# Altium PCB WireCuttingSampling.PcbDoc (part 2 of 2)
Units mil, origin at the board's own origin, x right, y up, seen from the top; angles counter-clockwise.
Board outline 4901 x 3424.05 mil, 2 copper layers (Top Layer, Bottom Layer); 137 components, 97 nets, 362 pads, 199 vias.
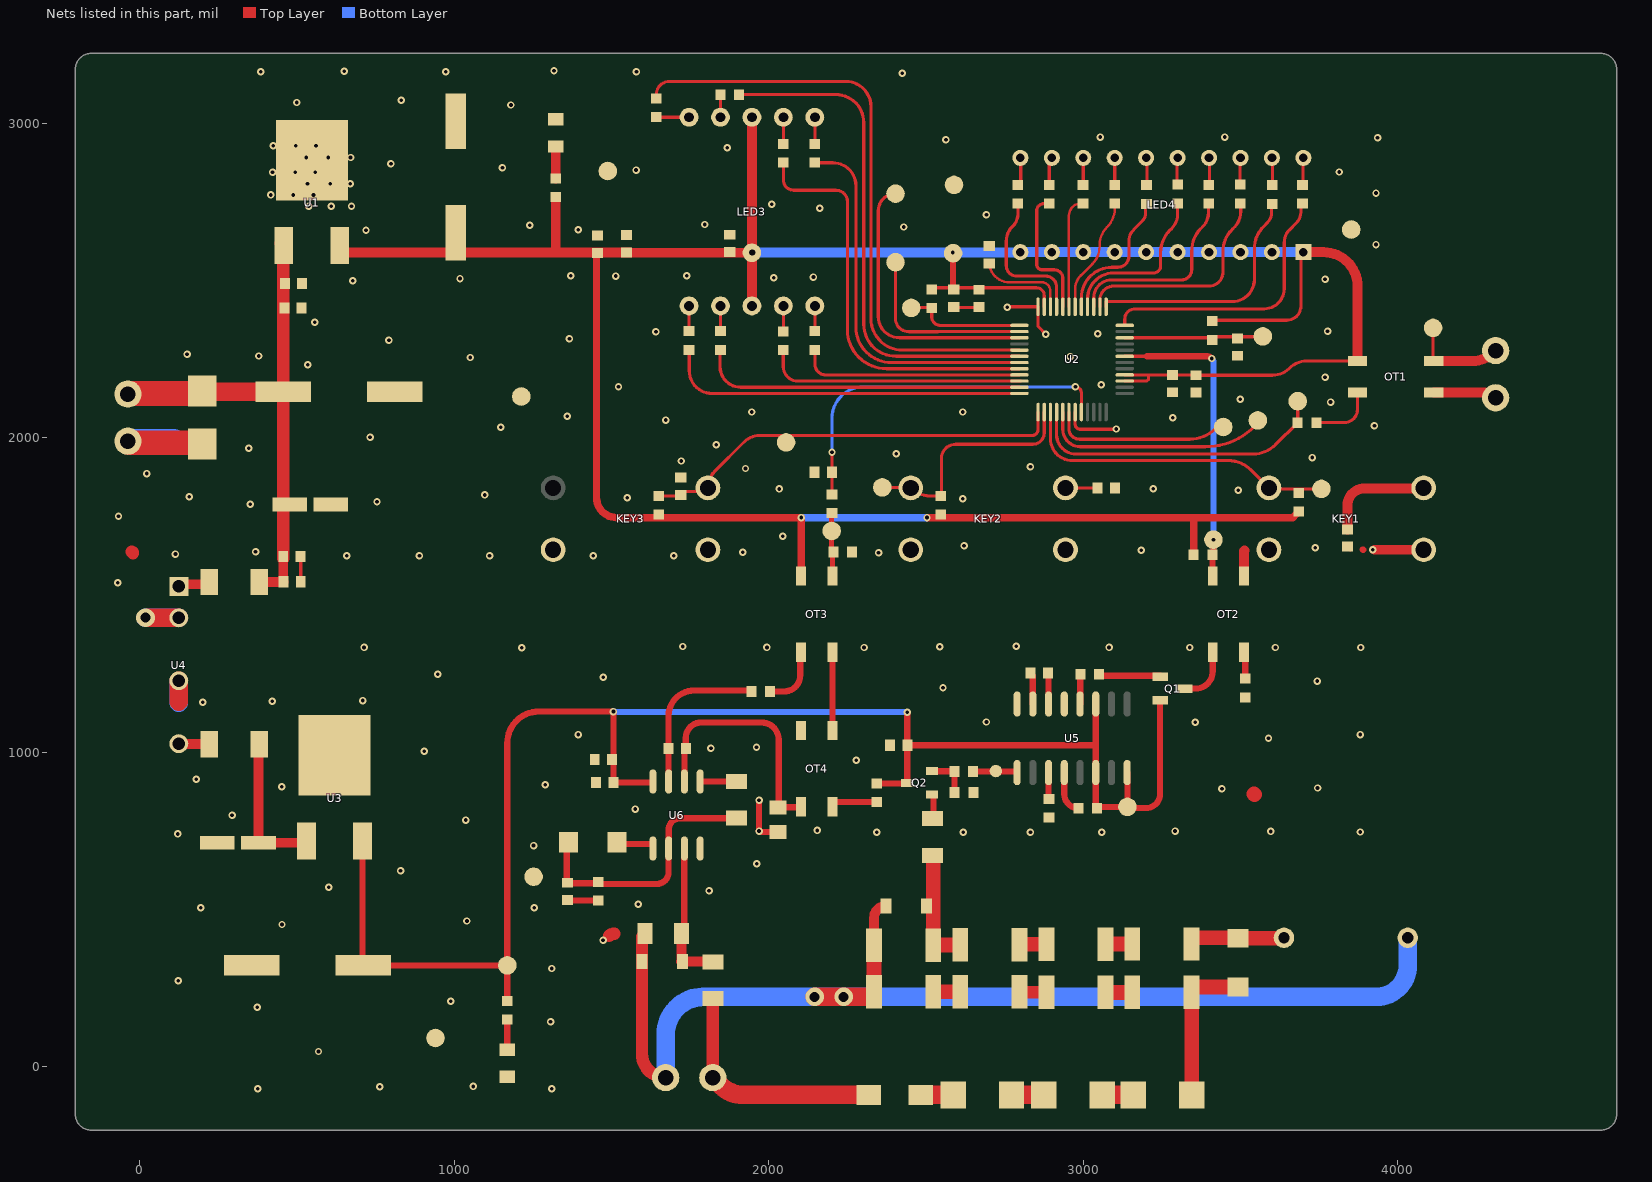
[diagram p2: the nets of this part, all layers, seen from the top]

## Part data (continued)
U5: "接口类型:-;最大输出频率:1.3MHz;输出通道数:2;", JLCPCB Part Class="Extended Part", LCSC Part Name=微功率锁相环, Manufacturer=HGSEMI(华冠), ManufacturerPart=CD4046BM/TR, Operating Temperature=-40℃~+85℃, Output Frequency(Max)=1.3MHz, Voltage - Supply=3V~15V, AddInBom=yes, Clock/Oscillator=外置, ConvertToPcb=yes, Cycle-to-Cycle Jitter=-, Datasheet=https://item.szlcsc.com/datasheet/CD4046BM%252FTR/8436734.html, Features=-, FootprintName=SOP-16_L9.9-W3.9-P1.27-LS6.0-BL, Input=-, Interface=-, ModelId=ed96d47c1e844792b3e705d722a1a1fa, ModelName=SOP-16_L9.9-W3.9-P1.27-LS6.0-BL, ModelTransform=389.763,236.22,0,0,0,0,0,0,0, Number of Outputs=2, Output=-, Period Jitter=-, Phase Jitter=-, Phase Offset=-, Supplier=LCSC, Supplier Footprint=SOP-16, SupplierPart=C7432285, Symbol=CD4046BM/TR
U6: "放大器数:2;轨到轨:-;增益带宽积(GBW):-;输入失调电压(Vos):7mV;压摆率(SR):-;输入偏置电流(Ib):150nA;", Ib - Input Bias Current=150nA, Input offset current drift(Ios TC)=10pA/℃, Input Offset Current(Ios)=5nA, Input Offset Voltage Drift(Vos TC)=10uV/℃, Input Voltage Noise Density=-, JLCPCB Part Class="Basic Part", LCSC Part Name=单电源双运算放大器, Manufacturer=onsemi(安森美), ManufacturerPart=LM358DR2G, Maximum Power Supply Range (Vdd-Vss)=32V, Operating Temperature=0℃~+70℃, Output Current=40mA, Quiescent Current=700uA, Vos - Input Offset Voltage=7mV, AddInBom=yes, Common Mode Rejection Ratio(CMRR)=70dB, ConvertToPcb=yes, Datasheet=https://item.szlcsc.com/datasheet/LM358DR2G/8427.html, Dual Supply=-16V~16V, Features=-, FootprintName=SOIC-8_L5.0-W4.0-P1.27-LS6.0-BL, Gain Bandwidth Product=-, ModelId=7abc64c95a1a4a04a4ef38f9097c870b, ModelName=SOIC-8_L5.0-W4.0-P1.27-LS6.0-BL, ModelTransform=192.913,236.22,0,0,0,0,0,0,0, Number of Channels=2, Rail to Rail=-, Single supply=3V~32V, Slew Rate=-, Supplier=LCSC, Supplier Footprint=SOIC-8, SupplierPart=C7950, Symbol=LM358DR2G

## Via types
v1: diameter 23.62, hole 11.81, Top Layer to Bottom Layer, tented both sides, 191 vias
v2: diameter 314.96, hole 157.48, Top Layer to Bottom Layer, tented both sides, 4 vias
v3: diameter 59.06, hole 31.5, Top Layer to Bottom Layer, tented both sides, 3 vias
v4: diameter 39.37, hole 19.68, Top Layer to Bottom Layer, tented both sides, 1 vias

## Nets (pads, with @x,y where several pads share a name; then routed paths per layer and width w, separated by ;. In a path a pad name is that pad's centre, name@x,y a point inside that pad or via, vN(x,y) a via of type N, cw(c..) or ccw(c..) an arc to the next point about the centre after c; other vN are vias at no path point)
+5V: C6.2 C7.1 C12.2 C13.2 C14.2 C15.2 C16.2 E2.1 LED3.3 LED3.8 LED4.1 LED4.2 LED4.3 LED4.4 LED4.5 LED4.6 LED4.7 LED4.8 LED4.9 LED4.10 OT1.1 OT3.4 R1.2 R2.2 R3.2 R4.2 R5.2 R6.2 R8.2 TP5.1 TP7.1 U1.3 U2.11 U2.39 U2.40 | length 9531.3
  Top Layer w10: R5.2@2513,2476.76 2585.75,2476.76 2851.24,2476.76 cw(c2851.24,2452.12) 2875.88,2452.12 U2.11@2875.88,2416.3 ; U2.39@3131.78,2180.1 3201.98,2180.1 3207.84,2185.96 3207.84,2199.7 ; U2.40@3131.78,2199.7 3207.84,2199.7 ; R1.2@3409,2373.7 3647.53,2373.7 ccw(c3647.53,2418.13) 3691.96,2418.13 LED4.1@3691.96,2589 ; OT1.1@3872.37,2244 3711.94,2244 ccw(c3711.94,2162.06) 3654,2220 cw(c3602.34,2271.66) 3602.34,2198.6 C6.2@3358,2198.6 3357,2199.6 C14.2@3284,2199.6 3283.9,2199.7 3207.84,2199.7
  Top Layer w19.68: C13.2@1451,2589 cw(c1448.59,2586.59) C13.2@1452,2586.59 ; v1(2585,2588.76) 2585.75,2588 2585.75,2476.76 2585.75,2472 C7.1@2588,2469.76 ; R4.2@3678.21,1758.14 3678.21,1759.24 3684.27,1765.3 R4.2@3685.37,1765.3
  Top Layer w23.62: C13.2@1452,2586.59 1452,1810 ccw(c1516,1810) 1516,1746 v1(2103,1746) OT3.4@2103,1560.06 ; R3.2@1650,1755.7 R3.2@1654.09,1751.61 ; v1@2505,1746 3351.7,1746 ; R8.2@3351.7,1639 3351.7,1746 ; R4.2@3678.21,1758.14 3666.07,1746 3351.7,1746
  Top Layer w31.5: U1.3@631,2589 1004,2589 1322.37,2589 ; R6.2@1322.37,2765.3 1322.37,2589 ; C12.2@1548,2589 1451,2589 1322.37,2589 ; C12.2@1548,2589.4 1559.18,2589.4 1560.58,2588 TP7.1@1946.27,2588 ; LED3.3@1946.37,2419 1946.27,2419 TP7.1@1946.27,2588 ; LED3.8@1946.37,3019 1946.27,3019.1 TP7.1@1946.27,2588 ; v4(1947.37,2589) 1946.37,2588 TP7.1@1946.27,2588 ; LED4.1@3700,2590 3764.25,2590 cw(c3764.25,2481.88) 3872.37,2481.88 OT1.1@3872.37,2244
  Bottom Layer w23.62: v1(2103,1746) v1(2503,1746)
  Bottom Layer w31.5: v4(1947.37,2589) 2799,2589 ccw(c2799,2590) LED4.10@2800,2590 LED4.9@2900,2590 LED4.8@3000,2590 LED4.7@3100,2590 LED4.6@3200,2590 LED4.5@3300,2590 LED4.4@3400,2590 LED4.3@3500,2590 LED4.2@3600,2590 LED4.1@3700,2590
+5VA: C19.1 C20.1 C21.1 E3.1 Q1.2 Q2.3 R7.1 R11.2 R47.2 TP16.1 TP17.1 U3.3 U5.3 U5.14 U5.16 U6.8 | length 5255.7
  Top Layer w19.68: U3.3@707.9,717.9 707.9,324.2 ccw(c710.1,324.2) E3.1@710.1,322 1166.37,322 ccw(c1166.37,324) TP17.1@1168.37,324 ; R7.1@1168.37,206 TP17.1@1168.37,322 TP17.1@1168.37,324 ; U6.8@1631.67,906.63 cw(c1628.17,906.63) 1628.17,903.13 C21.1@1506,903.13 v1(1506,1129) 1268.37,1129 ccw(c1268.37,1029) 1168.37,1029 TP17.1@1168.37,324 ; R47.2@2343.37,900.7 2438.84,900.7 ccw(c2438.84,902.13) Q2.3@2440.27,902.13 v1(2440.27,1127.27) ; C19.1@2441,1022 3039.67,1022 ; U5.3@3039.67,1153.1 3039.67,1022 ; U5.16@3139.67,935 cw(c3137.98,933.31) 3140.37,933.31 TP16.1@3140.37,826 ; Q1.2@3244.37,1164.6 3244.37,868 cw(c3198.37,868) 3198.37,822 3144.37,822 cw(c3144.37,826) TP16.1@3140.37,826 ; 3039.67,1022 U5.14@3039.67,935 3039.67,826 ccw(c3043.67,826) R11.2@3043.67,822 cw(c3053.33,812.34) 3053.33,826 TP16.1@3140.37,826
  Top Layer w39.37: U3.3@703.9,740.9 cw(c703.9,739.8) U3.3@705,739.8
  Bottom Layer w19.68: v1(1506,1129) 1506.75,1128.25 1509.54,1128.25 1510.51,1127.27 v1(2440.27,1127.27) v1@2440.43,1127.27
+12V: C1.2 C2.2 C3.2 C4.2 C17.1 CN1.1 D1.1 E1.1 L1.1 U1.1 | length 1662.8
  Top Layer w31.5: L1.1@380,1541 380,1545.6 384.1,1541.5 456.4,1541.5 C1.2@456.4,1542 455.9,1542 C2.2@455.9,1622 ; 452.4,1764.34 cw(c456,1764.34) C17.1@456,1767.94
  Top Layer w39.37: U1.1@448.53,2618.94 cw(c448.53,2609.45) U1.1@458.03,2609.45 ; C2.2@456,1616 456,1767.95 E1.1@456,2145.95 U1.1@456,2592.94
  Top Layer w59.06: D1.1@199,2148.96 ccw(c202.01,2148.96) 202.01,2145.95 E1.1@456,2145.95
  Top Layer w78.74: CN1.1@-38,2138.79 -36.5,2140.29 193.07,2140.29 199,2146.22 D1.1@199,2148.96
ADC0: C26.1 R43.2 U2.32 | length 1164.1
  Top Layer w10: R43.2@2201,1819.7 C26.1@2201,1890 v1(2201,1954) ; v1(2975,2161.76) cw(c2975,2142.78) 2993.98,2142.78 U2.32@2993.98,2081.6
  Bottom Layer w10: v1(2201,1954) 2201,2061.76 cw(c2301,2061.76) 2301,2161.76 v1(2975,2161.76)
GND: C1.1 C2.1 C3.1 C4.1 C5.1 C6.1 C7.2 C8.1 C9.1 C10.1 C11.1 C12.1 C13.1 C14.1 C15.1 C16.1 C17.2 C26.2 CN1.2 D1.2 E1.2 E2.2 KEY1.3 KEY1.4 KEY2.3 KEY2.4 KEY3.3 KEY3.4 LED1.1 OT2.3 R44.2 TP6.1 TP13.1 TP23.1 TP24.1 U1.2 U2.12 U2.31 U4.2 | length 1396.6
  Top Layer w10: C2.1@511,1622 511.5,1622 C1.1@511.5,1542 ; C7.2@2588,2415.9 2590.14,2413.76 C15.1@2672,2413.76 ; v1@2759,2416.76 2759,2416.3 U2.12@2856.18,2416.3 2856.18,2353.82 v1(2881,2329) ; U2.31@2974.28,2081.6 2974.28,2042.48 ccw(c2990,2042.48) 2990,2026.76 v1@3103.2,2026.76 ; C11.1@3840,1653.5 ccw(c3849.9,1653.5) C11.1@3849.9,1643.6 ; KEY1.3@4081.68,1644.5 cw(c4081.68,1643.6) KEY1.3@4082.58,1643.6
  Top Layer w19.68: 3889,1644.76 ccw(c3890.16,1644.76) 3890.16,1643.6
  Top Layer w31.5: OT2.3@3511.67,1560.06 3511.67,1639.43 cw(c3513,1639.43) 3513,1640.76 ; v1@3926,1643.6 KEY1.3@4082.58,1643.6
  Top Layer w39.37: -26,1636.76 cw(c-26,1632.76) -22,1632.76 ; v3@25,1425.76 cw(c26.24,1425.76) v3@26.24,1427 ; U4.2@121.24,1429.76 U4.2@124,1427
  Top Layer w59.06: CN1.2@-38,1988.79 CN1.2@-33.44,1984.22 ; v3@26.24,1427 U4.2@124,1427 ; D1.2@194.44,1984.22 D1.2@199,1979.66
  Top Layer w78.74: CN1.2@-33.44,1984.22 D1.2@194.44,1984.22
  Bottom Layer w39.37: v3(18,1427.76) ccw(c18.76,1427.76) v3@18.76,1427
  Bottom Layer w59.06: v3@18.76,1427 U4.2@124,1427
  Bottom Layer w78.74: CN1.2@-38,1988.79 -37.79,1989 107,1989
  other v1: -70,1539 658,1625 889,1625 1112,1625 1442,1625 1698,1625 113,1630 2349,1634 1917,1636 368,1637 3184,1641.76 3921,1644 3738,1649.76 2621,1656 2044,1687 -68,1750 351,1788 754,1796 2617,1805.76 1550,1809 157,1812 1097,1818 3493,1833 2033,1837 3223,1838 22,1886 1926,1902 2832,1907.76 1722,1926 3728,1936.76 2405,1949 346,1966 1833,1978 732,2001 3105,2027.76 1148,2033 3926,2038 1672,2056 3285,2063 1359,2068 1946,2081.76 2617,2081.76 3786.51,2113.21 3499,2122 1522,2162 3057,2168 3769,2192 534,2232 1051,2255 2958,2258 378,2259.76 150,2265 792,2310 1366,2315 3046,2331 1641,2337 3777,2338.76 556,2367 2758,2414.76 677,2499 3769,2503.51 1018,2506 2016,2508.76 2142,2510.76 1513,2514 1370,2515 1739,2515 3931,2614.24 719,2660 1393.72,2661.72 2429,2670 1240,2676 1796,2678 2692,2709 2162,2729.76 537,2736 609,2736 673,2736 2009,2742.76 416,2772 488,2772 552,2772 3931,2778 533,2808 605,2808 669,2808 422,2844 494,2844 558,2844 3814,2845 1578,2851 1153,2858 798.3,2871.2 529,2891 599,2891 670,2891 1868,2922 424,2928 496,2928 560,2928 2563.28,2947.28 3936,2954 3054,2956 3450,2956 1180,3058 499,3066 831,3073 2424,3159 384,3164 973,3164 1579,3164 650,3165 1317,3167
GND1: C18.2 C19.2 C20.2 C21.2 C22.2 C24.2 CN3.1 D2.2 D9.2 E3.2 LED2.1 OT4.2 R12.2 R14.1 R17.2 R18.1 R30.1 R33.2 R42.1 R50.1 TP14.1 TP22.1 U3.2 U4.4 U5.5 U5.8 U6.4 | length 4144.5
  Top Layer w19.68: C24.2@1362.95,528.3 R33.2@1458,528.3 ; R42.1@1596.6,413 cw(c1606.6,413) R42.1@1606.6,423 ; v1@1967.93,749 v1(1969,749) ; v1(1969,847) 1969,752 ccw(c1970,752) v1@1970,751 ; v1@1971,747 ccw(c1972,747) 1972,746 R50.1@2029,746 ; U5.5@2939.67,1153.1 U5.5@2940.23,1152.54
  Top Layer w31.5: R17.2@2334.9,383.63 R17.2@2334.9,386 ; R17.2@2334.9,388.7 2334.9,473.3 cw(c2372.6,473.3) D2.2@2372.6,511
  Top Layer w39.37: 116,1155.76 126,1155.76 cw(c130.83,1160.59) 124,1160.59 ; U4.4@122,1225 U4.4@124,1227 ; 1492,415.76 cw(c1509.48,398.27) 1509.48,423 ; R42.1@1596.6,413 D9.2@1596.6,333.76 1596.6,40.4 ccw(c1672,40.4) CN3.1@1672,-35 CN3.1@1654.37,-27.7
  Top Layer w47.24: R12.2@2334.8,238 2334.8,383.53 R17.2@2334.9,383.63 ; 3542.4,866.81 3544.2,865
  Top Layer w59.06: 124,1160.59 U4.4@124,1227 ; v3(2145.48,222) R12.2@2330.52,222
  Bottom Layer w39.37: 121,1155.76 ccw(c121,1157.76) 123,1157.76 ; U4.4@123,1226 cw(c124,1226) U4.4@124,1227
  Bottom Layer w59.06: 123,1157.76 U4.4@123,1226 ; CN3.1@1672,-35 1672,102 cw(c1791.68,102) 1791.68,221.69 2433,221.69 3854.8,221.68 3931.8,221.68 ccw(c3931.8,321.68) 4031.8,321.68 C22.2@4031.8,409.68
  other v1: 375,-70 1310,-70 763,-64 1060,-63 568,48 1306,143 373,189 989,208 122,273 1310,312 1473,402 452,452 1040,463 194,505 1254,505 1585,516 1810,559 601,570 829,623 1962,645 1252,703 120,740 2343,745 2618.76,745 2832,745 3059,745 3881,746 3596,748 3292,749 2154,751 1036,784 293.2,799.6 1575,819 3441,884 3745,886 451,890 1289,896 179.28,913.72 2278,974 904,1003 1816,1012 1961,1015.76 3589,1044 1394,1056 3881,1056 3356,1095 2692,1096 200,1159 421,1162 709,1164.09 2554,1205 3744,1226 1474,1238 947,1248 1214.24,1332 713,1333 1994,1333 2303,1332.91 3082,1333 3339,1332.91 3611,1332.91 3882,1332.91 2544,1335 1726,1336 2787,1337
  other v3: 2238,222
ICE_CLK: TP10.1 U2.30 | length 563.8
  Top Layer w10: U2.30@2954.58,2081.6 2954.58,2028.42 ccw(c2988,2028.42) 2988,1995 3338.46,1995 ccw(c3338.46,2109.74) 3419.59,2028.61 3419.98,2029 TP10.1@3437,2029
ICE_DAT: TP11.1 U2.29 | length 716.1
  Top Layer w10: U2.29@2934.88,2081.6 2934.88,2026.62 ccw(c2990.5,2026.62) 2990.5,1971 3387.81,1971 3387.88,1971 ccw(c3387.88,2193.4) 3545.14,2036.14 TP11.1@3546.35,2037.35
KEY1: KEY1.2 R4.1 TP4.1 U2.27 | length 1018.6
  Top Layer w10: U2.27@2895.58,2081.6 2895.58,1997.21 ccw(c2965.79,1997.21) 2965.79,1927 3462.06,1927 cw(c3462.06,1827) 3532.77,1897.71 KEY1.2@3590.28,1840.2 ; KEY1.2@3590.48,1840.4 ccw(c3598.69,1848.61) 3598.69,1837 3685.37,1837 TP4.1@3757.37,1837
KEY2: KEY2.2 R2.1 TP3.1 U2.26 | length 752.7
  Top Layer w10: TP3.1@2361,1842 2447.51,1842 cw(c2447.51,1836.54) KEY2.2@2451.37,1840.4 ccw(c2512.69,1901.72) 2512.69,1815 R2.1@2547,1815 ccw(c2542.17,1819.83) 2549,1819.83 2549,1934 cw(c2594,1934) 2594,1979 2840,1979 ccw(c2840,2015) 2876,2015 2876,2081.6 U2.26@2875.88,2081.6
KEY3: C10.2 KEY3.1 R3.1 TP2.1 U2.25 | length 1395.2
  Top Layer w10: R3.1@1650,1815 1717,1815 ccw(c1717,1818) C10.2@1720,1818 1730.75,1828.75 KEY3.1@1776.12,1828.75 ; KEY3.1@1806.36,1840.4 1794.71,1828.75 KEY3.1@1776.12,1828.75 ; U2.25@2856.18,2081.6 2856,2081.6 2856,2026 cw(c2837,2026) 2837,2007 1971.42,2007 ccw(c1971.42,1935.97) 1921.2,1986.2 1828.25,1893.25 ccw(c1881.1,1840.4) 1806.8,1848.48 1795.85,1848.48 KEY3.1@1776.12,1828.75
LED_A: R29.1 U2.18 | length 1641.4
  Top Layer w10: R29.1@1905.97,3091 2213.39,3091 cw(c2213.39,3002.39) 2302,3002.39 2302,2412.76 2302,2361.06 ccw(c2404.26,2361.06) 2404.26,2258.8 U2.18@2797.08,2258.8
LED_B: R31.1 U2.17 | length 1973.4
  Top Layer w10: R31.1@1642.37,3078.6 1642.37,3091 cw(c1684.37,3091) 1684.37,3133 2244.35,3133 cw(c2244.35,3052.35) 2325,3052.35 2325,2407.45 2325,2407.39 ; 2325,2412.76 2325,2378.5 ccw(c2425,2378.5) 2425,2278.5 U2.17@2797.08,2278.5
LED_C: R28.1 U2.23 | length 1043.7
  Top Layer w10: R28.1@1846.37,2279.4 ccw(c1846.37,2278.03) 1845,2278.03 1845,2226 ccw(c1910.6,2226) 1910.6,2160.4 U2.23@2797.08,2160.4
LED_D: R26.2 U2.22 | length 835.9
  Top Layer w10: R26.2@2046.37,2279 2046,2279 2046,2277.76 2046,2225.99 ccw(c2092.23,2225.99) 2092.23,2179.76 2772.33,2179.76 2772.55,2179.99 2801.84,2179.99 U2.22@2802,2179.82
LED_E: R24.2 U2.21 | length 715.4
  Top Layer w10: R24.2@2146.37,2279.3 2146.37,2234.39 ccw(c2181.06,2234.39) 2181.06,2199.7 U2.21@2797.08,2199.7
LED_F: R25.2 U2.20 | length 1322.8
  Top Layer w10: R25.2@2046.37,2874.4 2046.37,2820.12 ccw(c2079.49,2820.12) 2079.49,2787 2214,2787 cw(c2214,2751) 2250,2751 2250,2365.76 2250,2356.62 2250,2343.38 ccw(c2373.98,2343.38) 2373.98,2219.4 U2.20@2797.08,2219.4
LED_G: R23.2 U2.19 | length 1207.4
  Top Layer w10: R23.2@2146.37,2874.4 2203.8,2874.4 cw(c2203.8,2801.2) 2277,2801.2 2277,2372.5 ; 2277,2373.76 2277,2352.08 ccw(c2389.98,2352.08) 2389.98,2239.1 U2.19@2797.08,2239.1
LED_H: R32.1 U2.24 | length 1158.4
  Top Layer w10: R32.1@1746.37,2279.4 1747,2279.4 1747,2213 ccw(c1819.3,2213) 1819.3,2140.7 U2.24@2797.08,2140.7
NetC8_2: C8.2 U2.10 | length 297.5
  Top Layer w7.87: C8.2@2701,2559 ccw(c2766,2559) 2766,2494 2868,2494 cw(c2868,2466.42) 2895.58,2466.42 U2.10@2895.58,2416.3
NetC9_2: C9.2 KEY2.1 | length 102
  Top Layer w10: KEY2.1@2943.47,1840.4 C9.2@3045.51,1840.4
NetC11_2: C11.2 KEY1.1 | length 352.3
  Top Layer w31.5: C11.2@3840,1708.6 3840,1784 cw(c3895,1784) 3895,1839 4081.18,1839 ccw(c4081.18,1840.4) KEY1.1@4082.58,1840.4 ccw(c4084.51,1842.33) KEY1.1@4084.51,1839.6
NetC18_1: C18.1 L2.2 U3.1 | length 471.5
  Top Layer w31.5: L2.2@380,1025 ccw(c380,1022.4) 377.4,1022.4 C18.1@377.4,712 520.1,712 cw(c520.1,710) 522.1,710 U3.1@530,717.9
NetC22_1: C22.1 D3.1 R19.2 | length 295
  Top Layer w47.24: R19.2@3344.1,409.68 3488.14,409.68 cw(c3488.14,404.22) D3.1@3492,408.09 3634.34,408.09 ccw(c3634.34,413.55) C22.1@3638.2,409.68
NetC23_1: C23.1 U5.7 | length 101.9
  Top Layer w19.68: C23.1@2832.5,1252 2832.5,1250.05 2839.67,1242.88 U5.7@2839.67,1153.1
NetC23_2: C23.2 U5.6 | length 99.8
  Top Layer w19.68: C23.2@2887.6,1252 2889.11,1250.49 2889.11,1153.66 U5.6@2889.67,1153.1
NetC24_1: C24.1 D8.1 R33.1 R36.1 U6.2 | length 831.4
  Top Layer w19.68: C24.1@1357.67,584.73 1357.67,694.03 D8.1@1362.27,698.63 ; C24.1@1359.67,584.73 1361.42,582.98 1456.92,582.98 1458.67,581.23 1644.6,581.23 ccw(c1644.6,618) 1681.37,618 1681.37,693.33 U6.2@1681.67,693.63 1681.67,753.3 cw(c1718.37,753.3) 1718.37,790 1896.67,790 R36.1@1896.67,790.13
NetC25_1: C25.1 OT4.3 R50.2 U6.6 | length 785.9
  Top Layer w19.68: U6.6@1731.67,906.63 1732.19,907.15 1732.19,1008.15 C25.1@1736.17,1012.13 1736.17,1045.8 cw(c1784.37,1045.8) 1784.37,1094 1977.37,1094 cw(c1977.37,1040) 2031.37,1040 2031.37,827.07 cw(c2029,827.07) R50.2@2029,824.7 2101.3,824.7 OT4.3@2103,826.4
NetC25_2: C25.2 R39.1 U6.7 | length 520.1
  Top Layer w19.68: U6.7@1681.67,906.63 1681.37,906.93 1681.37,1011.83 C25.2@1681.07,1012.13 1681.07,1114.7 cw(c1762.37,1114.7) 1762.37,1196 1941.77,1196 cw(c1941.77,1193) R39.1@1944.77,1193
NetCN2_1: CN2.1 OT1.3 | length 201
  Top Layer w31.5: OT1.3@4114.87,2144 4270.33,2144 cw(c4270.33,2085.96) CN2.1@4311.37,2127
NetCN2_2: CN2.2 OT1.4 TP15.1 | length 311.5
  Top Layer w10: TP15.1@4112.37,2349 4112.37,2250.04 ccw(c4120.91,2250.04) OT1.4@4114.87,2244 ; CN2.2@4307.66,2273.29 CN2.2@4311.37,2277
  Top Layer w31.5: OT1.4@4114.87,2244 4236.95,2244 ccw(c4236.95,2344) CN2.2@4307.66,2273.29
NetCN3_2: CN3.2 D7.2 R41.1 | length 770.4
  Top Layer w31.5: CN3.2@1822,-35 CN3.2@1822.33,-34.67
  Top Layer w39.37: CN3.2@1822.33,-34.67 R41.1@1822.33,220.8
  Top Layer w59.06: CN3.2@1822,-35 1847.71,-60.71 ccw(c1918.42,10) 1918.42,-90 D7.2@2318,-90
NetD2_1: D2.1 R17.1 R21.1 R22.1 | length 378
  Top Layer w31.5: R22.1@2515.84,670 ccw(c2515.84,676.83) R22.1@2520.67,672
  Top Layer w47.24: R22.1@2520.67,672 cw(c2514.8,666.13) 2523.1,666.13 2523.1,530 2523.1,387 R17.1@2523.1,386 cw(c2525.51,383.59) 2525.51,387 R21.1@2608.8,387
NetD3_2: D3.2 D4.2 R16.1 | length 468.6
  Top Layer w47.24: R16.1@3344.1,236 cw(c3341.93,233.83) 3345,233.83 D4.2@3345,-90 ; R16.1@3349.65,253.38 D3.2@3492,253.38
NetD4_1: D4.1 D5.2 | length 99.1
  Top Layer w59.06: D5.2@3060,-90 D4.1@3159.1,-90
NetD5_1: D5.1 D6.2 | length 102.1
  Top Layer w59.06: D6.2@2772,-90 D5.1@2874.1,-90
NetD6_1: D6.1 D7.1 | length 102.8
  Top Layer w59.06: D7.1@2483.3,-90 D6.1@2586.1,-90
NetD8_2: D8.2 U6.1 | length 114.9
  Top Layer w19.68: D8.2@1517.3,713.76 1523.43,707.63 U6.1@1629.67,707.63
NetD9_1: D9.1 R41.2 R42.2 U6.3 | length 459.9
  Top Layer w19.68: R42.2@1723,423 1731,431 1731,663.84 1731.15,663.99 1731.15,693.11 U6.3@1731.67,693.63
  Top Layer w31.5: D9.1@1721.4,333.76 1823,333.76 R41.2@1823,333.2 ; D9.1@1722.5,336.5 R42.2@1722.5,420
NetL1_2: L1.2 U4.1 | length 105
  Top Layer w31.5: U4.1@125.8,1525.2 cw(c125.8,1527) U4.1@124,1527 131,1534 213.4,1534 L1.2@220.4,1541
NetL2_1: L2.1 U4.6 | length 105.6
  Top Layer w31.5: U4.6@124,1027 ccw(c125.5,1027) 125.5,1025.5 L2.1@228.7,1025.5
NetLED1_2: LED1.2 R6.1 | length 101.4
  Top Layer w31.5: R6.1@1322.37,2824.6 LED1.2@1322.37,2926
NetLED2_2: LED2.2 R7.2 | length 95.3
  Top Layer w19.68: LED2.2@1168,54 R7.2@1168,149.3
NetLED3_1: LED3.1 R24.1 | length 80.4
  Top Layer w10: R24.1@2146.37,2338.6 LED3.1@2146.37,2419
NetLED3_2: LED3.2 R26.1 | length 80.7
  Top Layer w10: R26.1@2046.37,2338.3 LED3.2@2046.37,2419
NetLED3_4: LED3.4 R28.2 | length 80.3
  Top Layer w10: R28.2@1846.37,2338.7 LED3.4@1846.37,2419
NetLED3_5: LED3.5 R32.2 | length 80.3
  Top Layer w10: R32.2@1746.37,2338.7 LED3.5@1746.37,2419
NetLED3_6: LED3.6 R31.2 | length 104.3
  Top Layer w10: R31.2@1642.37,3019.3 1642.37,3019 LED3.6@1746.37,3019
NetLED3_7: LED3.7 R29.2 | length 72.3
  Top Layer w10: LED3.7@1846.37,3019 1846.67,3019 R29.2@1846.67,3091
NetLED3_9: LED3.9 R25.1 | length 85.3
  Top Layer w10: R25.1@2046.37,2933.7 LED3.9@2046.37,3019
NetLED3_10: LED3.10 R23.1 | length 85.3
  Top Layer w10: R23.1@2146.37,2933.7 LED3.10@2146.37,3019
NetLED4_11: LED4.11 R51.1 | length 90.2
  Top Layer w10: R51.1@2791.96,2804 2801,2813.04 2801,2889 LED4.11@2800,2890
NetLED4_12: LED4.12 R49.1 | length 85.4
  Top Layer w10: R49.1@2891.96,2803.6 LED4.12@2891.96,2889
NetLED4_13: LED4.13 R48.1 | length 86.8
  Top Layer w10: R48.1@2999,2803.6 3000,2804.6 LED4.13@3000,2890
NetLED4_14: LED4.14 R46.1 | length 86.4
  Top Layer w10: R46.1@3100,2803.6 LED4.14@3100,2890
NetLED4_15: LED4.15 R45.1 | length 89.1
  Top Layer w10: LED4.15@3200,2890 3203,2887 3203,2805 R45.1@3201,2803
NetLED4_16: LED4.16 R40.1 | length 90
  Top Layer w10: R40.1@3291.96,2803.3 3298,2809.34 3298,2888 LED4.16@3300,2890
NetLED4_17: LED4.17 R38.1 | length 87.6
  Top Layer w10: R38.1@3399,2803.6 3401,2805.6 3401,2889 LED4.17@3400,2890
NetLED4_18: LED4.18 R37.1 | length 86.6
  Top Layer w10: R37.1@3499,2804.6 3498,2805.6 3498,2888 LED4.18@3500,2890
NetLED4_19: LED4.19 R35.1 | length 88.2
  Top Layer w10: LED4.19@3600,2890 3602,2888 3602,2804 R35.1@3601,2803
NetLED4_20: LED4.20 R34.1 | length 87.6
  Top Layer w10: R34.1@3697,2803.6 3699,2805.6 3699,2889 LED4.20@3700,2890
NetOT1_2: OT1.2 R9.1 | length 209.4
  Top Layer w10: R9.1@3740.97,2048 3830,2048 ccw(c3830,2090) 3872,2090 3872,2144 OT1.2@3872.37,2144
NetOT2_1: OT2.1 Q1.3 | length 182
  Top Layer w19.68: Q1.3@3324.4,1203 Q1.3@3323.4,1202 3356.24,1202 ccw(c3356.24,1257.76) 3412,1257.76 3412,1317.56 OT2.1@3411.67,1317.56
NetOT2_2: OT2.2 R14.2 | length 86
  Top Layer w19.68: OT2.2@3511.67,1317.56 cw(c3511.67,1314.23) 3515,1314.23 R14.2@3515,1233.46
NetOT3_1: OT3.1 R39.2 | length 199.9
  Top Layer w19.68: R39.2@2004.07,1193 2049.24,1193 ccw(c2049.24,1243.76) 2100,1243.76 2100,1314.56 OT3.1@2103,1317.56
NetOT3_2: OT3.2 OT4.1 | length 251.5
  Top Layer w19.68: OT3.2@2202.37,1319.8 2202.37,1068.9 OT4.1@2203,1068.9
NetOT3_3: OT3.3 R43.1 R44.1 TP21.1 | length 213.4
  Top Layer w10: R44.1@2202.4,1644 ccw(c2212.64,1644) R44.1@2205.4,1636.76
  Top Layer w15.75: R43.1@2200,1760.4 2200,1646.4 R44.1@2202.37,1644.03 ; OT3.3@2202.37,1560.06 R44.1@2202.37,1644.03 ; R44.1@2202.37,1648 R44.1@2202.37,1644.03
NetOT4_4: OT4.4 R47.1 | length 152.7
  Top Layer w19.68: OT4.4@2203,826.4 2203,835.09 cw(c2207.73,835.09) 2207.73,839.83 cw(c2209.31,839.83) 2209.31,841.4 R47.1@2343.37,841.4
NetQ1_1: Q1.1 R10.2 | length 202
  Top Layer w19.68: R10.2@3050.37,1248 3055.37,1243 Q1.1@3244.7,1243 ; Q1.1@3239.74,1239.36 Q1.1@3243.7,1235.4
NetQ2_1: Q2.1 R22.2 | length 81
  Top Layer w19.68: Q2.1@2518.97,864.73 2521.04,864.73 2524,861.77 2524,791.73 R22.2@2520.67,788.4
NetQ2_2: Q2.2 R27.2 R30.2 | length 142.7
  Top Layer w19.68: Q2.2@2521.44,942 Q2.2@2518.97,939.53 2588.45,939.53 cw(c2588.45,936.9) R27.2@2590.3,938.76 2590.3,874.17 ccw(c2593.71,874.17) R30.2@2591.3,871.76 R30.2@2591.6,872.06
NetR10_1: R10.1 U5.4 | length 95.1
  Top Layer w19.68: U5.4@2989.67,1153.1 2990.23,1153.66 R10.1@2990.23,1248
NetR11_1: R11.1 U5.12 | length 138.5
  Top Layer w19.68: U5.12@2939.67,935 2939.67,866.7 ccw(c2984.37,866.7) R11.1@2984.37,822
NetR12_1: R12.1 R13.2 | length 85.8
  Top Layer w47.24: R12.1@2523,238 R13.2@2608.8,238
NetR13_1: R13.1 R15.2 | length 86.3
  Top Layer w39.37: R13.1@2797,238 ccw(c2801.83,242.83) 2801.83,236 R15.2@2882.8,236
NetR15_1: R15.1 R16.2 | length 84.9
  Top Layer w47.24: R15.1@3071,236 R16.2@3155.9,236
NetR18_2: R18.2 U5.11 | length 83.9
  Top Layer w19.68: U5.11@2889.67,935 2889.67,854.67 ccw(c2894.21,854.67) R18.2@2891,851.46
NetR19_1: R19.1 R20.2 | length 85.2
  Top Layer w47.24: R20.2@3071,389 cw(c3073.41,386.59) 3073.41,390 R19.1@3155.9,390
NetR20_1: R20.1 R21.2 | length 86.3
  Top Layer w47.24: R21.2@2797,387 cw(c2801.83,382.17) 2801.83,389 R20.1@2882.8,389
NetR27_1: R27.1 TP20.1 U5.9 | length 144.4
  Top Layer w19.68: R27.1@2649.6,938.76 2716.17,938.76 ccw(c2716.17,945.59) 2721,940.76 2723,938.76 2788.32,938.76 2789.67,937.41 U5.9@2789.67,935
NetR36_2: R36.2 U6.5 | length 115
  Top Layer w19.68: U6.5@1781.67,906.63 U6.5@1781.67,906.63 1896.62,906.58 R36.2@1896.67,906.53
NetTP12_1: TP12.1 U2.15 | length 909.8
  Top Layer w10: TP12.1@2403,2776 ccw(c2403,2721) 2348,2721 2348,2385 ccw(c2415.1,2385) 2415.1,2317.9 U2.15@2797.08,2317.9
PWM_IN: OT2.4 R8.1 TP19.1 U2.43 | length 975.9
  Top Layer w10: U2.43@3131.78,2258.8 3203,2258.8 ; v1@3408.37,2253 3409,2252.37 v1(3409,2251.76) ; R8.1@3410.7,1627.76 ccw(c3410.7,1631.06) 3411,1627.77 ccw(c3410.7,1631.06) R8.1@3414,1631.06
  Top Layer w19.68: 3203,2258.8 3394.37,2258.8 cw(c3394.37,2239) v1@3408.37,2253 ; R8.1@3410.7,1627.76 3410.7,1561.03 ccw(c3411.67,1561.03) OT2.4@3411.67,1560.06 ; R8.1@3414,1631.06 v1(3414,1675.76)
  Bottom Layer w10: v1(3409,2251.76) 3414,2246.76 v1@3414,2243.68
  Bottom Layer w19.68: v1(3414,1675.76) v1@3414,2243.68
PWM_OUT: R9.2 TP18.1 U2.28 | length 978.9
  Top Layer w10: U2.28@2915.18,2081.6 2915.18,2009.89 2915.18,2009.83 ccw(c2976.86,2009.82) 2976.85,1948.14 2976.92,1948.14 3540.39,1948.14 ccw(c3540.39,2048.14) 3611.1,1977.43 R9.2@3681.67,2048 3682,2048 TP18.1@3682,2116
RED1: R34.2 U2.48 | length 869.4
  Top Layer w10: U2.48@3131.78,2357.2 3131.78,2376.84 cw(c3164.69,2376.84) 3164.69,2409.76 3377,2409.76 ; 3377.68,2409.76 3575.44,2409.76 ccw(c3575.44,2473.32) 3639,2473.32 3639,2621 cw(c3694.53,2621) 3655.26,2660.26 3678,2683 ccw(c3644.3,2716.7) 3691.96,2716.7 R34.2@3691.96,2744
RED2: R35.2 U2.1 | length 809.2
  Top Layer w10: U2.1@3072.68,2416.3 3072.68,2432.48 3072.96,2432.76 3474,2432.76 ccw(c3474,2502.76) 3540.18,2479.96 ; 3544,2502.76 cw(c3474,2502.76) 3540.18,2479.96 ; R35.2@3601,2743.7 3599,2741.7 3599,2716 cw(c3553.13,2716) 3585.53,2683.53 3573.29,2671.29 ccw(c3644,2600.58) 3544,2600.58 3544,2498.9 cw(c3495.1,2498.9) 3540.18,2479.96
RED3: R37.2 U2.2 | length 699.6
  Top Layer w10: U2.2@3052.98,2416.3 3052.98,2438.66 cw(c3096.32,2438.66) 3096.32,2482 3399.72,2482 ccw(c3399.72,2526.28) 3444,2526.28 3444,2591.58 cw(c3544,2591.58) 3473.29,2662.29 3481,2670 ccw(c3432.72,2718.28) 3501,2718.28 3501,2743.3 R37.2@3499,2745.3
RED4: R38.2 U2.3 | length 616.8
  Top Layer w10: U2.3@3033.38,2416.3 3033.38,2445.14 cw(c3090.24,2445.14) 3090.24,2502 3313,2502 ccw(c3313,2534) 3345,2534 3345,2594.58 cw(c3445,2594.58) 3374.29,2665.29 3379,2670 ccw(c3333.13,2715.87) 3398,2715.87 3398,2743.3 R38.2@3399,2744.3
RED5: R40.2 U2.4 | length 531.6
  Top Layer w10: U2.4@3013.68,2416.3 3013.68,2441.16 cw(c3096.52,2441.16) 3096.52,2524 3224,2524 ccw(c3224,2546) 3246,2546 3246,2588.58 cw(c3346,2588.58) 3275.29,2659.29 3281,2665 ccw(c3235.13,2710.87) 3300,2710.87 R40.2@3300,2745.3
RED6: R45.2 U2.5 | length 441.5
  Top Layer w10: U2.5@2993.98,2416.3 2993.98,2445.47 cw(c3090.51,2445.47) 3090.51,2542 3110,2542 ccw(c3110,2577) 3145,2577 3145,2625 cw(c3195.7,2625) 3159.85,2660.85 3188.06,2689.06 ccw(c3164.2,2713) 3198,2713 3198,2740.7 R45.2@3201,2743.7
RED7: R46.2 U2.6 | length 367
  Top Layer w7.87: U2.6@2974.28,2416.3 2974.28,2472.25 ; 2974.28,2472.29 cw(c3036.44,2472.29) 2992.46,2516.22 3028.91,2552.66 ccw(c2973.15,2608.42) 3052,2608.42 3052,2613.47 cw(c3130.53,2613.47) 3075,2669 ccw(c3014.64,2729.36) 3100,2729.36 R46.2@3100,2744.3
RED8: R48.2 U2.7 | length 349.3
  Top Layer w7.87: 2954.57,2587.62 cw(c2991.96,2589) 2954.57,2590.37 ; U2.7@2954.58,2416.3 2954.58,2587.3 ccw(c2946.71,2587.34) 2954.58,2587.62 ; 2954.58,2590.37 ccw(c2946.71,2590.66) 2954.58,2590.7 2954.58,2706.92 cw(c2991.96,2706.92) R48.2@2991.96,2744.3
RED9: R49.2 U2.8 | length 422.2
  Top Layer w10.01: R49.2@2891.96,2744.3 2874.96,2744.3 ccw(c2874.96,2721.34) 2852,2721.34 2852,2551 ccw(c2869,2551) 2869,2534 2908,2534 cw(c2908,2507.12) 2934.88,2507.12 U2.8@2934.88,2416.3
RED10: R51.2 U2.9 | length 469.6
  Top Layer w10: R51.2@2791.96,2744.7 2791.96,2710.12 cw(c2740.88,2710.12) 2777,2674 2774.09,2671.09 ccw(c2820.18,2625) 2755,2625 2755,2547 ccw(c2788,2547) 2788,2514 2880,2514 cw(c2880,2478.82) 2915.18,2478.82 U2.9@2915.18,2416.3
RESET: C5.2 R1.1 TP1.1 U2.46 | length 440
  Top Layer w10: U2.46@3131.78,2317.9 3403.13,2317.9 ccw(c3403.13,2328.14) 3410.37,2320.9 TP1.1@3571,2320.9
UART0_RX: R5.1 TP8.1 U2.13 | length 388.1
  Top Layer w10: TP8.1@2453,2413.76 2516.7,2413.76 cw(c2516.7,2412.46) R5.1@2518,2412.46 2518,2385.05 ccw(c2545.85,2385.05) 2545.85,2357.2 U2.13@2797.08,2357.2
UART0_TX: TP9.1 U2.14 | length 598
  Top Layer w10: TP9.1@2403,2558 2402.5,2557.5 2402.5,2379.83 ccw(c2445.57,2379.83) 2445.57,2336.76 2538,2336.76 cw(c2538.74,2336.76) 2538.74,2337.5 U2.14@2797.08,2337.5
pads on no net: KEY3.2 U2.16 U2.33 U2.34 U2.35 U2.36 U2.37 U2.38 U2.41 U2.42 U2.44 U2.45 U2.47 U5.1 U5.2 U5.10 U5.13 U5.15
copper on no net: | length 3.7
  Top Layer w10: 1314.26,1840.7 ccw(c1316.96,1840.7) 1314.28,1840.38 1315.77,1838.89 ccw(c1386.48,1909.6) 1316.65,1838.02
  other v1: 3211,1538.52
  other v2: 0,0 4469,5 10,3022.06 4489,3022.06

## Polygon pours and split planes (outlines as drawn)
GND1 on Bottom Layer "GND1_L02_P013" (solid, remove dead copper, pour order 13): 3911,1368.39 684,1363.57 684,1191.76 88,1191.76 88,244.34 345,244.34 345,-98.24 1341,-98.24 1341,372.52 1538,372.52 1538,524.52 1897.07,524.52 2106.04,716 3911,716
GND on Bottom Layer "GND_L02_P012" (solid, remove dead copper, pour order 12): 355,3195 355,2302 -98,2302 -98,1396.76 165,1396.76 165,1591.76 3967,1591.76 3967,2985 2588.03,2985 2455.52,3195
GND1 on Top Layer "GND1_L01_P011" (solid, remove dead copper, pour order 11): 3913,1365.76 683.44,1365.76 683.44,1191.76 93.44,1191.76 93.44,244.58 345,244.58 345,-98 1341,-98 1341,372.76 1538,372.76 1538,524.76 1761,524.76 1900.21,524.76 2104.64,716 3913,716
GND on Top Layer "GND_L01_P015" (solid, remove dead copper, pour order 15): 355,3195 355,2302 -98,2302 -98,1396.76 165,1396.76 165,1591.76 3967,1591.76 3967,2985 2588.03,2985 2455.52,3195

## Other copper
Top Layer:
  rectangle net GND: -22,1396.76 75,1473
  rectangle net GND: 385,2704 723,3038
  rectangle net GND1: 1528,372.76 1630,530
  pour cut-out: 2753.5,2938.5 2753.5,2839.5 3745,2839.5 3745,2938.5
  pour cut-out: 2402.5,2507 2481.5,2507 2481.5,2494 2402.5,2494
  pour cut-out: 1981.69,2792.44 1982.12,2792 2035.88,2792 2035.88,2779 1981.69,2779
  pour cut-out: 2181.81,2454.44 2182.24,2454 2236,2454 2236,2441 2181.81,2441
  pour cut-out: 76.2,2026.7 416,2026.7 416,2101.7 76.2,2101.7
  pour cut-out: -100,2302 -100,1922 10.01,1922 10.01,2302
  pour cut-out: 579.23,796.64 658.66,796.64 658.66,639.16 579.23,639.16
  pour cut-out: 2685.18,915.05 2685.18,900.05 2758.42,900.05 2758.42,915.05
  pour cut-out: 333,1086.38 264,1087.27 264,964 333,964
  pour cut-out: 1769.34,715.6 1770,767 1766,767 1766,715.6
  pour cut-out: 1769.34,715.6 1770,767 1766,767 1766,715.6
  pour cut-out: 1657.6,552.66 1709,552 1709,556 1657.6,556
  pour cut-out: 74,1477.14 74,1447 158.69,1447 158.69,1477.14
  pour cut-out: 2393,1808.26 2393,1773.26 2413.97,1773.26 2414.35,1808.26
  pour cut-out: 3564.85,1930.26 3564.85,1895.26 3575.81,1895.26 3576.19,1930.26
  pour cut-out: 3471.84,2084.76 3471.84,2049.76 3520.15,2049.76 3520.53,2084.76
  pour cut-out: 3592.84,2088.76 3592.84,2053.76 3641.15,2053.76 3641.53,2088.76
  pour cut-out: 3603,2067.76
  pour cut-out: 3201,1222 3201,1183 3272,1183 3272,1185 3272,1222
  pour cut-out: 2955.61,1211.43 2955.61,1197.39 2957.61,1197.39 2957.61,1211.43
  pour cut-out: 2921,1213.02 2921,1198.98 2923,1198.98 2923,1213.02
  pour cut-out: 2923.03,1208.45
  pour cut-out: 2797,1214.04 2797,1206 2799,1206 2799,1214.04
  pour cut-out: 2797.98,1201.96
  pour cut-out: 1408,766.96 1408,750 1472,750 1472,766.96
Bottom Layer:
  rectangle net GND: -33,1396 75,1478
  pour cut-out: -100,2302 -100,1922 10.01,1922 10.01,2302
  pour cut-out: 74.32,1477.32 74.31,1447.17 159,1447.17 159,1477.32

## Silkscreen, mask and mechanical layers (free items; w line width, h text height)
Top Overlay:
  text "+" at -60,2237 h60
  text "-" at -4.01,1837 h60 r90
  text "+" at 1929,-19 h60 r270
  text "-" at 1510,-68.99 h60
Mechanical 1:
  pour cut-out: 74,1477
  lines w3.94: -204.96,3172.05 -205,-152 ccw(c-155,-152) -155,-202 ; -204.9,3172.05 cw(c-154.9,3172.05) -154.9,3222.05 4646,3222.05 cw(c4646,3172.05) 4696,3172.05 4696,-152 cw(c4646,-152) 4646,-202 ; -154.96,-202 4645.15,-202
  lines w7.87: 35.61,2043.97 -114,2043.97 cw(c-114,2063.65) -114,2083.34 35.61,2083.34 ; 37,2043.97 ccw(c37,2063.65) 37,2083.34 ; 2637.61,52.26 2488,52.26 cw(c2488,71.95) 2488,91.63 2637.61,91.63 ; 2639,52.26 ccw(c2639,71.95) 2639,91.63 ; 2915.61,52.26 2766,52.26 cw(c2766,71.95) 2766,91.63 2915.61,91.63 ; 2917,52.26 ccw(c2917,71.95) 2917,91.63 ; 3194.61,52.26 3045,52.26 cw(c3045,71.95) 3045,91.63 3194.61,91.63 ; 3196,52.26 ccw(c3196,71.95) 3196,91.63 ; 3736.29,291.76 3586.68,291.76 cw(c3586.68,311.44) 3586.68,331.13 3736.29,331.13 ; 3737.68,291.76 ccw(c3737.68,311.44) 3737.68,331.13 ; 1727.62,43 cw(c1747.31,43) 1766.99,43 1767,-116 cw(c1747.32,-116) 1727.64,-116 1727.62,43